# Altium PCB Pukk-Sensor-PCB.PcbDoc (part 6 of 6)
Units mil, origin at the board's own origin, x right, y up, seen from the top; angles counter-clockwise.
Board outline 3937.01 x 3149.61 mil, 4 copper layers (Top Layer, Layer 1, Layer 2, Bottom Layer), stack 61.653 mil thick; 261 components, 166 nets, 704 pads, 236 vias.
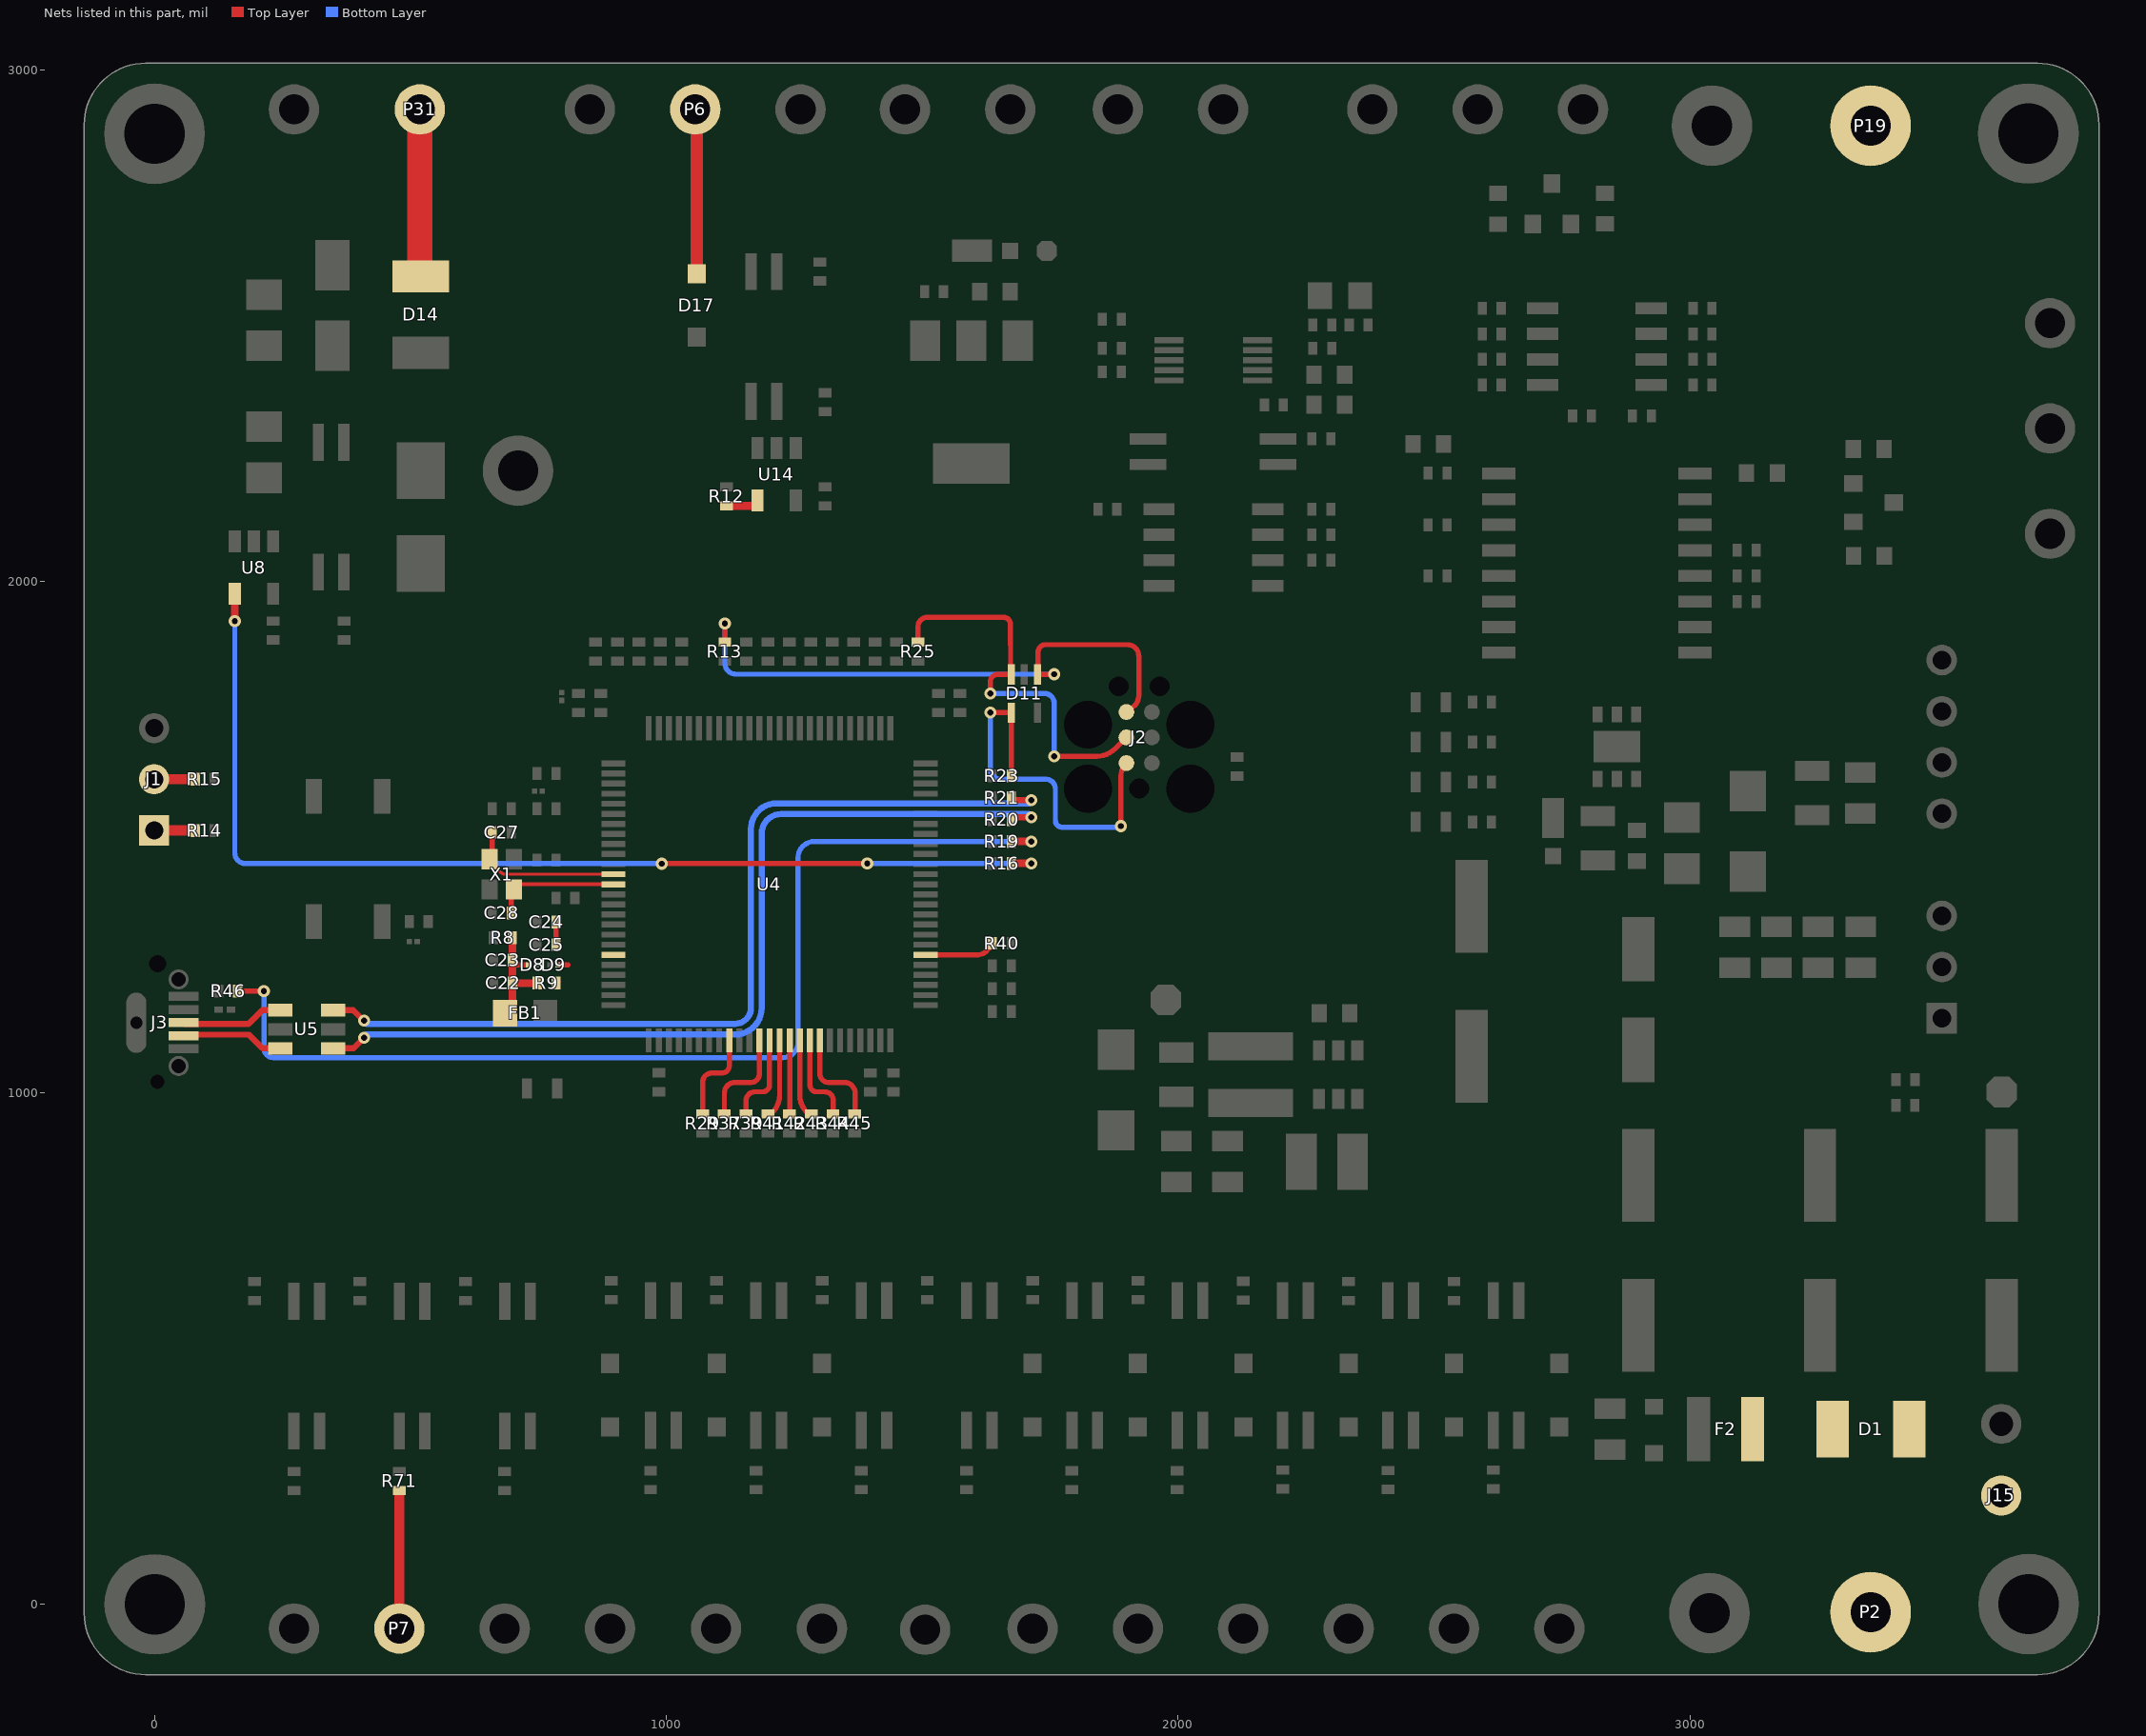
[diagram p5: the nets of this part, all layers, seen from the top]

## Via types
v1: diameter 23.62, hole 11.81, Top Layer to Bottom Layer, tented both sides, 234 vias
v2: diameter 23.62, hole 11.81, Top Layer to Bottom Layer, 2 vias

## Nets (pads, with @x,y where several pads share a name; then routed paths per layer and width w, separated by ;. In a path a pad name is that pad's centre, name@x,y a point inside that pad or via, vN(x,y) a via of type N, cw(c..) or ccw(c..) an arc to the next point about the centre after c; other vN are vias at no path point) (continued)
PD9: R40.1 U4.56 | length 140.2
  Top Layer w10: U4.56@1506.54,1269.57 1608.54,1269.57 ccw(c1608.54,1292.08) 1624.43,1276.15 1632.66,1284.38 1632.66,1284.66 1632.95,1284.66 R40.1@1636.66,1292.16
PE7: R37.2 U4.37 | length 196.2
  Top Layer w10: R37.2@1113.05,958.5 1113.05,999.18 cw(c1134.03,999.18) 1134.03,1020.16 1164.88,1020.16 ccw(c1164.88,1037.01) 1181.74,1037.01 U4.37@1181.74,1102.25
PE8: R39.2 U4.38 | length 176.4
  Top Layer w10: R39.2@1155.51,958.5 1155.51,984.68 cw(c1172.54,984.68) 1172.54,1001.72 1187.64,1001.72 ccw(c1187.64,1015.5) 1201.42,1015.5 U4.38@1201.42,1102.25
PE9: R41.2 U4.39 | length 153.2
  Top Layer w10: R41.2@1198.69,958.5 1206.19,961.61 1207.19,962.02 1208.6,963.43 1208.76,963.59 ccw(c1173.99,995.38) 1221.11,995.38 ; 1221.11,995.43 U4.39@1221.11,1102.25
PE10: R42.2 U4.40 | length 145.7
  Top Layer w10: R42.2@1237.43,958.5 ccw(c1237.43,961.86) 1240.79,961.86 U4.40@1240.79,1102.25
PE11: R43.2 U4.41 | length 153.2
  Top Layer w10: 1260.48,995.38 ccw(c1307.59,995.38) 1272.82,963.59 1272.98,963.43 1274.39,962.02 1275.39,961.61 R43.2@1282.89,958.5 ; 1260.48,995.43 U4.41@1260.48,1102.25
PE12: R44.2 U4.42 | length 176.4
  Top Layer w10: U4.42@1280.16,1102.25 1280.16,1015.5 ccw(c1293.94,1015.5) 1293.94,1001.72 1309.04,1001.72 cw(c1309.04,984.68) 1326.07,984.68 R44.2@1326.07,958.5
PE13: R45.2 U4.43 | length 196.2
  Top Layer w10: U4.43@1299.85,1102.25 1299.85,1037.01 ccw(c1316.7,1037.01) 1316.7,1020.16 1347.55,1020.16 cw(c1347.55,999.18) 1368.53,999.18 R45.2@1368.53,958.5
PH0-OSC_IN: C27.2 U4.12 X1.1 | length 312.3
  Top Layer w6: X1.1@654.57,1456.52 667.32,1439.84 676.56,1430.59 ccw(c685.16,1439.27) 685.16,1427.05 875.68,1427.05 U4.12@896.3,1427.05
  Top Layer w10: X1.1@654.57,1456.52 659.7,1456.52 C27.2@659.7,1508.99
PH1-OSC_OUT: C28.2 U4.13 X1.3 | length 259.2
  Top Layer w7: X1.3@701.82,1407.37 U4.13@896.3,1407.37
  Top Layer w10: C28.2@696.7,1350.99 696.7,1397.47 X1.3@701.82,1397.47 X1.3@701.82,1410.57
RIGHT: P7.1 R71.1 | length 267.5
  Top Layer w20: P7.1@477.9,-47.43 R71.1@477.9,220.03
SNS_SPEED: D17.2 P6.1 | length 323.2
  Top Layer w20: P6.1@1056.11,2922.17 cw(c1056.11,2919.18) P6.1@1059.11,2919.18
  Top Layer w25: D17.2@1059.11,2600.73 P6.1@1059.11,2919.18
SPEED_SIG: R12.2 U14.4 | length 66.5
  Top Layer w15: R12.2@1117.38,2146.98 1167.18,2146.98 ccw(c1167.18,2157.64) U14.4@1177.84,2157.64
SWCLK: D11.3 J2.4 R25.2 | length 792.6
  Top Layer w10: R25.2@1491.64,1880.87 1491.64,1911.34 cw(c1509.6,1911.34) 1509.6,1929.3 1658.4,1929.3 cw(c1658.4,1915.68) 1672.03,1915.68 1672.58,1832.31 D11.3@1673.66,1817.63 1647.08,1817.63 ccw(c1647.08,1803.21) 1632.66,1803.21 v1(1632.66,1780.23) ; v1(1757.8,1657.56) 1840.26,1657.56 ; 1840.3,1657.56 ccw(c1840.3,1709.75) 1877.21,1672.85 J2.4@1898.67,1694.31
  Bottom Layer w10: v1(1632.66,1780.23) 1738.57,1780.23 cw(c1738.57,1761) 1757.8,1761 v1(1757.8,1657.56)
SWDIO: D11.4 J2.2 R23.2 | length 754.1
  Top Layer w10: v1(1632.66,1742.83) D11.4@1673.66,1742.83 R23.2@1673.66,1619.37 R23.2@1673.66,1613.87 ; v1(1888,1521) 1888,1618.55 cw(c1924.43,1618.55) J2.2@1898.67,1644.31
  Bottom Layer w10: v1(1632.66,1742.83) 1632.66,1633.51 ccw(c1653.67,1633.51) 1653.67,1612.51 1741.67,1612.51 cw(c1741.67,1594.24) 1759.94,1594.24 1759.94,1531.75 ccw(c1772.7,1531.75) 1772.7,1519 1886,1519 ccw(c1886,1521) v1(1888,1521)
SWO: D11.1 J2.6 R13.1 | length 1179.7
  Top Layer w10: R13.1@1114.02,1880.87 v1(1114.02,1916.98) ; v1(1757.8,1817.9) 1757.8,1817.63 1731.73,1817.63 cw(c1731.73,1823.28) 1726.09,1823.28 1726.09,1860.52 cw(c1741.36,1860.52) 1741.36,1875.8 1900.7,1875.8 cw(c1900.7,1853.5) 1923,1853.5 1923,1776.65 cw(c1894.56,1776.65) 1911.48,1753.79 J2.6@1898.67,1744.31
  Bottom Layer w10: v1(1114.02,1916.98) 1114.02,1839.93 ccw(c1136.06,1839.93) 1136.06,1817.9 v1(1757.8,1817.9)
TACH_COIL: D14.2 P31.1 | length 327.3
  Top Layer w50: P31.1@517.9,2922.17 517.9,2597.62 D14.2@519.83,2595.69
TACH_SIG: R16.2 U8.4 | length 2114.6
  Top Layer w10: v1(990.68,1447.71) 990.9,1447.93 1392.18,1447.93 v1(1392.4,1448.15)
  Top Layer w15: v1(156.3,1921.92) U8.4@156.3,1975.17 ; R16.2@1673.66,1448.15 v1(1713,1448.15)
  Bottom Layer w10: v1(156.3,1921.92) 156.3,1468.65 ccw(c176.8,1468.65) 176.8,1448.15 990.24,1448.15 v1(990.68,1447.71) ; v1(1392.4,1448.15) v1(1713,1448.15)
TEST_LED: R29.1 U4.34 | length 181.9
  Top Layer w10: R29.1@1070.59,958.5 1070.59,1020.16 cw(c1089.29,1020.16) 1089.29,1038.87 1108.9,1038.87 ccw(c1108.9,1052.65) 1122.68,1052.65 U4.34@1122.68,1102.25
USART1_RX: J1.2 R15.1 | length 76.2
  Top Layer w20: J1.2@-1.3,1612.57 R15.1@74.93,1612.57
USART1_TX: J1.1 R14.1 | length 76.2
  Top Layer w20: J1.1@-1.3,1512.57 R14.1@74.93,1512.57
USB2.0_N: J3.2 U5.6 | length 201
  Top Layer w12: J3.2@56.42,1111.18 58.72,1113.48 142.9,1113.48 ; 142.93,1113.5 183.73,1113.5 210.44,1086.79 245.23,1086.79 U5.6@245.35,1086.67
USB2.0_P: J3.3 U5.4 | length 201.3
  Top Layer w12: J3.3@56.42,1136.77 58.72,1134.48 134.2,1134.48 ; 134.23,1134.5 183.27,1134.5 210.44,1161.67 245.16,1161.67 U5.4@245.43,1161.4
USB_FS_ID: R19.2 R46.1 | length 2108.2
  Top Layer w10: R46.1@161.84,1198.38 v1(213.28,1198.38)
  Top Layer w15: R19.2@1673.66,1490.95 v1(1713,1490.96)
  Bottom Layer w10: v1(213.28,1198.38) 213.28,1087.36 ccw(c232.17,1087.36) 232.17,1068.47 1226.77,1068.47 ccw(c1226.77,1098.6) 1256.91,1098.6 1256.91,1459.12 cw(c1288.75,1459.12) 1288.75,1490.96 v1(1713,1490.96)
USB_FS_N: R20.2 U5.1 | length 1816.4
  Top Layer w12: U5.1@348.65,1086.67 348.77,1086.79 388.41,1086.79 v1(409,1107.38) ; R20.2@1673.66,1533.76 1673.66,1538.35 v1(1713,1538.35)
  Bottom Layer w12: v1(409,1107.38) cw(c415.31,1107.38) 415.31,1113.69 1134.04,1113.69 ccw(c1134.04,1165.65) 1186,1165.65 1186,1506.68 cw(c1223.97,1506.68) 1223.97,1544.66 1706.69,1544.66 cw(c1706.69,1538.35) v1(1713,1538.35)
USB_FS_P: R21.2 U5.3 | length 1820.3
  Top Layer w12: U5.3@348.57,1161.4 348.84,1161.67 387.51,1161.67 408.18,1141 v1(409,1141) ; R21.2@1673.66,1576.56 1673.66,1571.97 v1(1713,1571.97)
  Bottom Layer w12: v1(409,1141) ccw(c415.31,1141) 415.31,1134.69 1134.04,1134.69 ccw(c1134.04,1165.65) 1165,1165.65 1165,1515.38 cw(c1215.28,1515.38) 1215.28,1565.66 1706.69,1565.66 ccw(c1706.69,1571.97) v1(1713,1571.97)
VBAT: D1.2 J15.1 P2.1 P19.1
VDDA: C22.2 C23.2 D8.2 FB1.1 R8.1 R9.2 | length 229.2
  Top Layer w10: FB1.1@684.36,1155.5 FB1.1@699.05,1170.2 ; C23.2@698.7,1259.2 ccw(c708.02,1259.2) C23.2@699.05,1256.67 ; C23.2@699.79,1249.89 D8.2@726.97,1249.89
  Top Layer w15: C23.2@698.7,1259.2 R8.1@698.7,1303.04 ; FB1.1@699.05,1170.2 C22.2@699.05,1214.36 ; C23.2@699.05,1256.67 C22.2@699.05,1214.36 ; R9.2@747.4,1214.37 C22.2@699.05,1214.36
VIN: D1.1 F2.1
VREFP: C24.2 C25.2 D9.2 R9.1 U4.20 | length 65.5
  Top Layer w10: R9.1@783.93,1214.37 R9.1@784.4,1214.37 ccw(c784.4,1217.56) R9.1@787.59,1217.56 ; C25.2@783.93,1289.35 C24.2@783.92,1333.97 ; D9.2@791.8,1249.89 807.16,1249.89
pads on no net: D11.5 J2.MP1 J2.MP2 J2.MP3 J2.MP4 J2.MP5 J2.MP6 J2.MP7 J3. J3.1 U1.5 U1.8 U3.1 U3.4 U3.5 U4.1 U4.2 U4.3 U4.4 U4.5 U4.7 U4.8 U4.9 U4.15 U4.16 U4.17 U4.18 U4.23 U4.24 U4.25 U4.28 U4.29 U4.30 U4.31 U4.32 U4.33 U4.35 U4.36 U4.44 U4.45 U4.46 U4.47 U4.53 U4.54 U4.57 U4.58 U4.59 U4.60 U4.61 U4.62 U4.63 U4.64 U4.65 U4.66 U4.68 U4.77 U4.78 U4.79 U4.85 U4.90 U4.91 U4.97 U4.98 U5.5 U7.4 U7.6 U7.7 U7.14 U8.1 U14.1

## Polygon pours and split planes (outlines as drawn)
GND on Layer 1 "NONET_L-01_P-001" (solid, pour order 3): 2377,2542 cw(c2420,2542) 2420,2585 3215,2585 cw(c3215,2541) 3259,2541 3259,2328 3259,2277.4 cw(c3224.6,2277.4) 3224.6,2243 3122.26,2243 ccw(c3122.26,2198.18) 3077.45,2198.18 3077.45,1970.24 ccw(c3118.82,1971.38) 3119.96,1930 3475.5,1930 3522,1930 cw(c3522.01,1882.01) 3570,1882 3570,1488 3570,1349 cw(c3526.57,1349) 3526.57,1305.57 1860.57,1305.57 ccw(c1860.56,1256) 1811,1256 1811,799 ccw(c1848,799) 1848,762 2732.99,762 cw(c2732.99,701.99) 2793,701.99 2793,381.18 cw(c2744.27,381.17) 2744.26,332.44 -137.79,332.44 -137.79,-20.91 ccw(c-21.27,-20.91) -21.26,-137.43 3682.49,-137.43 ccw(c3682.49,-20.71) 3799.22,-20.71 3799.21,2912.17 ccw(c3699.22,2912.18) 3699.22,3012.17 -36.77,3012.17 ccw(c-36.77,2912.18) -136.77,2912.17 -136.77,2533.32 1554,2533.32 cw(c1554,2498.32) 1589,2498.32 1589,2233.2 ccw(c1631.93,2233.19) 1631.93,2190.27 1968.28,2190.27 ccw(c1968.29,2225.98) 2004,2225.99 2004,2279 cw(c2044.99,2279.01) 2045,2320 2231.18,2320 cw(c2231.18,2282.11) 2269.08,2282.1 2269.08,2015.92 ccw(c2294.74,2015.92) 2294.74,1990.26 2350.18,1990.26 ccw(c2350.83,2016.43) 2377,2015.79
AGND on Layer 1 "NONET_L-01_P-001" (solid, pour order 0): 681,1411.6 ccw(c704.92,1411.6) 704.92,1387.68 945.32,1387.68 cw(c945.32,1361) 972,1361 972,1278.91 cw(c953.59,1278.91) 953.59,1260.5 696.03,1260.5 ccw(c696.03,1245.47) 681,1245.47 681,1197.27 cw(c660.74,1197.26) 660.73,1177 591,1177 cw(c591,1196) 572,1196 572,1572 cw(c603,1572) 603,1603 647.91,1603 cw(c647.91,1569.91) 681,1569.91
GND-ISO on Layer 1 "NONET_L-01_P-001" (solid, pour order 16): -137.79,-17.43 -137.79,2892.17 cw(c-17.79,2892.17) -17.79,3012.17 3679.22,3012.17 cw(c3679.22,2892.17) 3799.22,2892.17 3799.22,-17.43 cw(c3679.22,-17.43) 3679.22,-137.43 -17.79,-137.43 cw(c-17.79,-17.43)
GND on Top Layer "NONET_L-01_P-001" (solid, pour order 26): 2435,1267.11 2435,1124.24 cw(c2412.97,1124.24) 2412.96,1102.21 2371.35,1102.21 2338.37,1102.21 2338.37,1057.96 ccw(c2350.18,1057.96) 2350.18,1046.15 2473.31,1046.15 ccw(c2473.31,1062.84) 2490,1062.84 2490,1172.45 cw(c2507.55,1172.45) 2507.55,1190 2968.45,1190 ccw(c2968.45,1206.25) 2984.7,1206.25 2984.33,1252.17 2984.33,1285 cw(c3003.68,1285) 3003.68,1304.35 3363.7,1304.35 3363.7,1344.35 2867.88,1344.35 2867.88,1328.69 cw(c2844.76,1328.69) 2844.76,1305.57 2650,1305.57 cw(c2650,1330.16) 2625.41,1330.16 2625.41,1437.84 ccw(c2608.28,1437.85) 2608.28,1454.97 2572.33,1454.97 2513.36,1454.97 cw(c2513.36,1474.97) 2493.36,1474.97 2493.36,1626.95 2435,1626.95
3V3-ISO on Top Layer "NONET_L-01_P-001" (solid, pour order 15): 2683,1448.7 cw(c2711.85,1448.7) 2711.85,1477.55 2841.29,1477.55 cw(c2841.29,1464.95) 2853.89,1464.95 2853.89,1354.59 cw(c2844.3,1354.59) 2844.3,1345 2696,1345 cw(c2696,1358) 2683,1358
GND on Top Layer "NONET_L-01_P-001" (solid, pour order 24): 238.35,2744 189.05,2744 ccw(c189.05,2714.95) 160,2714.95 160,2202.1 cw(c130,2202.1) 130,2172.1 -135.38,2172.1 cw(c-135.38,2174.52) -137.79,2174.52 -137.79,2892 cw(c-37.79,2892) -37.79,2992 238.35,2992
12V on Top Layer "NONET_L-01_P-001" (solid, pour order 4): 2507.55,1021 ccw(c2507.55,1034.03) 2520.58,1034.03 2520.58,1138.36 cw(c2543.93,1138.36) 2543.93,1161.71 2757.95,1161.71 2997.71,1161.71 ccw(c2997.71,1180) 3016,1180 3016,1232.5 3016,1255 cw(c3040,1257) 3038,1281 3745,1281 cw(c3745,1250.24) 3775.76,1250.24 3775.76,728.57 cw(c3747.19,728.57) 3747.19,700 3207.62,700 ccw(c3207.62,673.15) 3180.77,673.15 3180.77,474.29 cw(c3151.48,474.29) 3151.48,445 3143,445 3087.4,445 ccw(c3087.4,415.37) 3057.77,415.37 3057.77,274.51 cw(c3035.8,274.51) 3035.79,252.53 2989.99,252.53 cw(c2989.6,274.71) 2967.42,274.33 2967.42,320.91 ccw(c2941.53,320.92) 2941.52,346.81 2813.7,346.81 2813.7,346.28 cw(c2813.7,375.98) 2784,375.98 2784,738 ccw(c2760,738) 2760,762 2317,762 cw(c2317,779.22) 2300.97,772.93 2300.97,1009.19 cw(c2312.78,1009.19) 2312.78,1021
GND on Top Layer "NONET_L-01_P-001" (solid, pour order 5): 3340,670 3235.13,670 ccw(c3235.13,649.99) 3215.12,649.99 3215.12,466.43 ccw(c3237.49,466.43) 3237.49,444.07 3544.55,444.07 cw(c3544.55,419.62) 3569.01,419.62 3569.01,337.64 ccw(c3593.45,337.64) 3593.45,313.2 3756.32,313.2 ccw(c3756.32,332.64) 3775.76,332.64 3775.76,644.12 ccw(c3749.88,644.12) 3749.88,670
GND-ISO on Top Layer "NONET_L-01_P-001" (solid, remove dead copper, pour order 23): -137.79,-17.43 -137.79,2892.17 cw(c-17.79,2892.17) -17.79,3012.17 3679.22,3012.17 cw(c3679.22,2892.17) 3799.22,2892.17 3799.22,-17.43 cw(c3679.22,-17.43) 3679.22,-137.43 -17.79,-137.43 cw(c-17.79,-17.43)
5V on Top Layer "NONET_L-01_P-001" (solid, pour order 13): 1811.92,1060.08 ccw(c1827.46,1060.07) 1827.47,1044.53 2015.47,1044.53 ccw(c2015.47,1058.91) 2029.84,1058.91 2029.84,1211.86 ccw(c2008.7,1211.86) 2008.7,1233 1826.86,1233 ccw(c1826.86,1218.06) 1811.92,1218.06
GND on Top Layer "NONET_L-01_P-001" (solid, pour order 10): 2977.67,1921.9 3112.12,1921.9 ccw(c3112.12,1930) 3120.22,1930 3120.22,1975 cw(c3129.22,1975) 3129.22,1984 3242.22,1984 cw(c3242.22,1972.59) 3253.64,1972.59 3253.64,1863.24 cw(c3238.67,1863.24) 3238.67,1848.28 2976.19,1848.28 cw(c2976.19,1859.47) 2965,1859.47 2965,1909.23 cw(c2977.67,1909.23)
GND on Top Layer "NONET_L-01_P-001" (solid, pour order 9): 1811,969.27 cw(c1823.58,969.27) 1823.58,981.86 1898.07,981.86 cw(c1898.07,965.79) 1914.14,965.79 1914.14,862.05 ccw(c1930.9,862.05) 1930.9,845.29 2158.53,845.29 ccw(c2158.53,867.09) 2180.33,867.09 2180.33,904.94 cw(c2195.68,904.94) 2195.68,920.28 2270.78,920.28 cw(c2270.78,903.87) 2287.19,903.87 2287.19,772.93 cw(c2276.26,772.93) 2276.26,762 1838,762 cw(c1838,789) 1811,789
GND on Top Layer "NONET_L-01_P-001" (solid, pour order 8): 2290.64,2513.18 2290.64,2388.03 ccw(c2298.28,2388.03) 2298.28,2380.39 2338.59,2380.39 ccw(c2338.59,2390.31) 2348.51,2390.32 ccw(c2347.99,2390.35) 2348.51,2390.37 2348.51,2513.18
12V on Layer 2 "NONET_L-01_P-001" (solid, pour order 11): 745,2573.32 ccw(c793.54,2573.32) 793.54,2524.78 2448.78,2524.78 cw(c2448.78,2473.26) 2500.29,2473.26 2500.29,2274.36 ccw(c2516.26,2274.36) 2516.26,2258.39 2969.77,2258.39 cw(c2969.77,2210.09) 3018.07,2210.09 3018.07,363.07 cw(c2955,363.07) 2955,300 967.04,300 ccw(c967.04,232.96) 900,232.96 900,-82.23 ccw(c934.81,-82.23) 934.81,-117.04 3150,-117.04 ccw(c3150,-80.43) 3186.61,-80.43 3186.61,2957.21 ccw(c3186.25,2957.08) 3186.58,2957.26 ccw(c3152.08,2957.28) 3152.1,2991.78 745,2991.78
3V3-ISO on Layer 2 "NONET_L-01_P-001" (solid, pour order 20): 724.61,3012.17 724.61,2573.32 ccw(c793.54,2573.32) 793.54,2504.38 1655.9,2504.38 cw(c1655.9,2455.27) 1705.02,2455.27 1705.02,2350.69 ccw(c1761.1,2350.69) 1761.1,2294.61 2111.76,2294.61 cw(c2111.76,2239.06) 2167.31,2239.06 2167.31,1520.31 cw(c2118.39,1520.31) 2118.39,1471.39 1845.06,1471.39 ccw(c1845.06,1414.94) 1788.61,1414.94 1788.61,997.13 ccw(c1853.53,997.13) 1853.53,932.21 2088.94,932.21 ccw(c2088.94,989.84) 2146.58,989.84 2146.58,1237.74 cw(c2185,1237.74) 2185,1276.16 2592.18,1276.16 ccw(c2592.18,1344.97) 2660.99,1344.97 2660.99,1832.33 cw(c2714.77,1832.33) 2714.77,1886.11 2948.89,1886.11 cw(c2948.89,1835) 3000,1835 3000,378.62 cw(c2941.98,378.62) 2941.98,320.6 946.68,320.6 ccw(c946.68,256.49) 882.58,256.49 882.58,-134.47 cw(c879.61,-134.47) 879.61,-137.43 -17.79,-137.43 cw(c-17.79,-17.43) -137.79,-17.43 -137.79,2892.17 cw(c-17.79,2892.17) -17.79,3012.17
5V on Layer 2 "NONET_L-01_P-001" (solid, pour order 14): 1767.97,2504.78 ccw(c1767.97,2462.22) 1725.41,2462.22 1725.41,2354.59 ccw(c1765,2354.59) 1765,2315 2150.06,2315 cw(c2150.15,2278.14) 2187.01,2278.23 2187.01,1513.01 cw(c2125,1513.01) 2125,1451 1849,1451 ccw(c1849,1411) 1809,1411 1809,1002 ccw(c1858.4,1002) 1858.4,952.6 2073.61,952.6 ccw(c2073.61,1005.18) 2126.18,1005.18 2126.18,1261.37 cw(c2165.81,1261.37) 2165.82,1301 2587.8,1301 ccw(c2587.8,1354.19) 2640.99,1354.19 2640.8,1632.24 2640.8,1871.9 cw(c2675.41,1871.9) 2675.41,1906.51 2977.67,1906.51 ccw(c2977.67,1926.52) 2997.68,1926.52 2997.68,2210.09 ccw(c2969.77,2210.09) 2969.77,2238 2515.76,2238 cw(c2515.76,2273.76) 2480,2273.76 2480,2471.27 ccw(c2446.49,2471.27) 2446.49,2504.78
VBAT on Layer 2 "NONET_L-01_P-001" (solid, pour order 12): 3207,2963.78 cw(c3235,2963.78) 3235,2991.78 3606.11,2991.78 ccw(c3605.36,3011.42) 3625,3012.17 3699.22,3012.17 cw(c3699.22,2912.17) 3799.22,2912.17 3799.22,-37.43 cw(c3699.22,-37.43) 3699.22,-137.43 3634.27,-137.43 ccw(c3613.62,-137.7) 3613.35,-117.04 3239.57,-117.04 cw(c3239.57,-84.47) 3207,-84.47
GND-ISO on Bottom Layer "NONET_L-01_P-001" (solid, remove dead copper, pour order 25): -137.79,-17.43 -137.79,2892.17 cw(c-17.79,2892.17) -17.79,3012.17 3679.22,3012.17 cw(c3679.22,2892.17) 3799.22,2892.17 3799.22,-17.43 cw(c3679.22,-17.43) 3679.22,-137.43 -17.79,-137.43 cw(c-17.79,-17.43)
3V3-ISO on Bottom Layer "NONET_L-01_P-001" (solid, pour order 22): 3116.16,2560 cw(c3116.16,2536.61) 3139.54,2536.61 3139.54,1362.8 cw(c3107.96,1362.8) 3107.96,1331.21 2683,1331.21 cw(c2683,1363.28) 2650.94,1363.28 2650.94,1775.48 cw(c2680.46,1775.48) 2680.46,1805 2744.99,1805 ccw(c2744.99,1840.01) 2780,1840.01 2780,2185 ccw(c2754.57,2185) 2754.56,2210.44 2632.15,2210.44 cw(c2632.15,2239.53) 2603.05,2239.53 2603.05,2546.47 cw(c2621.58,2546.47) 2621.58,2565 2688,2565 cw(c2688,2548.32) 2704.68,2548.32 2704.68,2318.88 ccw(c2732.3,2318.88) 2732.3,2291.26 2966.26,2291.26 ccw(c2966.26,2314.51) 2989.51,2314.51 2989.51,2541.18 cw(c3008.28,2541.23) 3008.24,2560

## Other copper
Top Layer:
  rectangle net GND: 3119.07,1915.23 3230.02,1984
  rectangle net 12V: 2300.97,968.35 2397.74,1021
  rectangle net GND-ISO: 2809.99,1703.6 2829.67,1771.74
  rectangle net GND-ISO: 730.81,1480.2 755.92,1567.77
  rectangle net GND-ISO: 721.35,1559.34 741.99,1591.53
  rectangle net GND-ISO: 761.24,1782.15 827.52,1796.96
  rectangle net GND-ISO: 949.19,1078.63 966.1,1155.5
  rectangle net 12V: 2300.97,924.28 2344.28,1007.72
  rectangle net GND-ISO: 2812.43,1691 2827.1,1739.34
  rectangle net AGND: 737.92,1276.85 755.93,1346.47
  rectangle net NetR79_1: 1571.3,2229.64 1619.88,2469.8
  region net 3V3-ISO: 2776.57,1477.55 2853.89,1477.55 2853.89,1353.64 cw(c2845.25,1353.64) 2845.25,1345 cw(c2845.25,1348.95) 2841.29,1348.95 2841.29,1477.55
  region net GND: 2338.37,1080.09 2338.37,1055.61 ccw(c2347.83,1055.61) 2347.83,1046.15 2351.13,1046.15 ccw(c2351.13,1053.39) 2358.37,1053.39 2358.37,1060.09 ccw(c2338.37,1060.09)
  region net 3V3-ISO: 723.06,1752.23 ccw(c723.06,1734.87) 705.7,1734.87 705.7,1611.92 755.92,1611.92 755.92,1668.4 cw(c764.52,1668.4) 764.52,1677 957.52,1677 958.86,1677 961.48,1677.52 963.96,1678.55 966.18,1680.03 968.07,1681.92 969.56,1684.15 970.58,1686.62 971.11,1689.24 971.1,1690.58 971.11,1736.11 971.11,1737.7 970.49,1740.81 969.27,1743.74 967.51,1746.38 965.26,1748.63 962.62,1750.39 959.69,1751.61 956.58,1752.23
  region net BATT: 854.53,1551.07 919.92,1551.07 919.92,1539.26 773.92,1539.26 cw(c773.92,1545.55) 767.63,1545.55 767.63,1631.79 cw(c773.53,1631.79) 773.53,1637.68 841.6,1637.68 cw(c841.6,1632.23) 847.06,1632.23 847.06,1558.54 ccw(c854.53,1558.54)
  region net 3V3-ISO: 1468,1680.85 cw(c1476.01,1680.85) 1476.01,1688.87 1497.52,1688.87 ccw(c1497.65,1697.76) 1506.54,1697.64 1506.54,1744.7 1507.97,1748.15 1510.61,1750.8 1514.07,1752.23 1545.18,1752.23 1547.99,1751.06 1550.14,1748.91 1551.3,1746.11 1551.3,1647.19 1549.5,1642.83 1546.16,1639.49 1541.8,1637.68 1476.92,1637.68 1472.83,1639.38 1469.7,1642.51 1468,1646.61 1468,1648.82
  region net 5V-ISO: 3272.14,1562.07 3272.14,1514.14 cw(c3256,1514.13) 3256,1498 2958.36,1498 cw(c2958.36,1517.65) 2938.71,1517.65 2938.71,1552.57 ccw(c2937.16,1552.57) 2937.16,1554.12 2937.16,1566.93 ccw(c2928.31,1566.93) 2928.31,1575.78 2896.23,1575.78 cw(c2896.23,1587.22) 2884.79,1587.22 2884.79,1629.1 cw(c2890.68,1629.1) 2890.68,1635 2933,1635 ccw(c2933,1644) 2942,1644 2942,1692 cw(c2956,1692) 2956,1706 3151.64,1706 cw(c3151.64,1689.41) 3168.23,1689.41 3168.23,1579.77 ccw(c3185.93,1579.77) 3185.93,1562.07
  region net NetC9_2: 1954,1021 2287.19,1021 2287.19,954.37 cw(c2273.82,954.37) 2273.82,941 2176,941 ccw(c2176,922) 2157,922 2157,889.18 cw(c2141.82,889.18) 2141.82,874 1956,874 cw(c1956,888) 1942,888 1942,1009 cw(c1954,1009)
  region net VBAT: 3540.01,354.83 3540.01,315.49 ccw(c3573.08,315.49) 3573.08,282.42 3744.54,282.42 cw(c3744.53,251.95) 3775,251.94 3775,176 3775,174.1 3774.5,170.33 3773.52,166.66 3772.06,163.15 3770.16,159.85 3767.85,156.84 3765.16,154.15 3762.15,151.84 3758.85,149.93 3755.34,148.48 3751.67,147.5 3747.9,147 3746,147 3522.38,147 3520.46,146.94 3516.65,146.44 3512.94,145.44 3509.39,143.97 3506.06,142.05 3503.01,139.71 3500.29,136.99 3497.95,133.94 3496.03,130.61 3494.56,127.06 3493.56,123.35 3493.06,119.54 3493,117.62 3493,-86 3493,-87.9 3492.5,-91.67 3491.52,-95.34 3490.07,-98.85 3488.16,-102.15 3485.85,-105.16 3483.16,-107.85 3480.15,-110.16 3476.85,-112.07 3473.34,-113.52 3469.67,-114.5 3465.9,-115 3464,-115 3260.97,-115 3256.94,-114.47 3253.01,-113.42 3249.26,-111.86 3245.74,-109.83 3242.52,-107.36 3239.64,-104.48 3237.17,-101.26 3235.14,-97.74 3233.58,-93.99 3233,-91.81 3233,197 3233.59,202.76 3234.38,205.7 3235.73,208.97 3237.5,212.03 3239.66,214.84 3242.16,217.34 3244.97,219.5 3248.03,221.27 3251.3,222.62 3254.72,223.54 3258.23,224 3260,224 3342,224 3343.39,224.05 3346.15,224.41 3348.84,225.13 3351.41,226.19 3353.82,227.58 3356.03,229.28 3357.99,231.25 3359.69,233.45 3361.08,235.86 3362.14,238.43 3362.86,241.12 3363.23,243.88 3363.27,245.27 3363.27,324.74 3363.27,384.31 cw(c3391.02,384.31) 3391.02,412.06 3512.9,412.06 cw(c3512.89,384.94) 3540.01,384.93
  region net VIN: 3088.82,390.93 cw(c3111.46,390.93) 3111.46,413.57 3291.95,413.57 cw(c3291.77,385.18) 3320.16,385 3320.16,271.16 cw(c3301.1,271.16) 3301.1,252.1 3111.46,252.1 cw(c3111.46,274.74) 3088.82,274.74
  region net VREFP: 806.56,1352.39 780.84,1352.39 ccw(c780.84,1343.79) 772.24,1343.78 772.24,1278.66 ccw(c780.41,1278.66) 780.41,1270.5 792.27,1270.5 cw(c792.27,1265.29) 797.48,1265.29 797.48,1237.74 cw(c791.45,1237.74) 791.45,1231.71 774.22,1231.71 ccw(c774.22,1226.73) 769.24,1226.73 769.24,1202.56 ccw(c775.06,1202.56) 775.06,1196.74 810.45,1196.74 ccw(c810.46,1204.72) 818.44,1204.72 818.44,1258.7 cw(c823.27,1258.7) 823.27,1263.54 919.92,1263.54 919.92,1275.48 851.97,1275.48 cw(c851.97,1280.42) 847.03,1280.42 847.03,1343.42 ccw(c838.07,1343.42) 838.06,1352.39
  region net NetC12_2: 2847.39,1629.1 2847.39,1592.39 cw(c2839,1592.39) 2839,1584 2793.54,1584 ccw(c2793.54,1577.42) 2786.96,1577.42 2786.96,1507.41 ccw(c2796.72,1507.41) 2796.73,1497.65 2913.73,1497.65 ccw(c2913.73,1507.31) 2923.38,1507.31 2923.38,1550.98 ccw(c2913.73,1550.98) 2913.73,1560.64 2876.48,1560.64 cw(c2876.48,1570.05) 2867.07,1570.05 2867.07,1629.1
  region net NetFB1_2: 739.48,1181.49 820.8,1181.49 ccw(c820.8,1191.18) 830.5,1191.18 830.5,1248.23 cw(c838.06,1248.23) 838.06,1255.79 919.92,1255.79 919.92,1243.98 863.38,1243.98 ccw(c863.38,1236.11) 855.5,1236.11 855.5,1131.95 cw(c848.89,1131.95) 848.89,1125.33 737.81,1125.33 cw(c737.81,1132.31) 730.83,1132.31 730.83,1172.84 cw(c739.48,1172.84)
  region net NetC1_2: 3218.14,1706 ccw(c3218.14,1682) 3194.14,1682 3194.14,1607.36 ccw(c3215.75,1607.61) 3216,1586 3282.71,1586 3282.71,1586.19 3382.71,1586.19 3382.71,1586 3462.31,1586 3472.97,1592.16 3485.69,1595.57 3498.86,1595.57 3511.57,1592.16 3522.24,1586 3543.98,1586 3551.33,1589.04 3556.96,1594.67 3560,1602.02 3560,1689.98 3556.96,1697.33 3551.33,1702.96 3543.98,1706 3523.42,1706 3522.97,1705.56 3511.57,1698.97 3498.86,1695.57 3485.69,1695.57 3472.97,1698.97 3461.57,1705.56 3461.13,1706
  pour cut-out: 1673.66,1761.73 1510.73,1761.73 1510.73,1917.54 1673.66,1917.54
  pour cut-out: -117.4,1870 -117.4,2157.14 366.69,2157.14 366.69,2319.36 445,2319.36 445,3012.17 925,3012.17 925,1870
  pour cut-out: 1790.61,1147.45 1794.62,1147.45 1794.62,970.51 1790.61,970.51
  pour cut-out: 2673.87,1480.11 2671.04,1477.28 2652.45,1495.87 2655.28,1498.7
  pour cut-out: 2640.96,1562.28 2635.15,1562.28 2635.15,1658.04 2640.96,1658.04
  pour cut-out: 1983.06,1728.82 1933.18,1728.82 1933.18,1774.5 1983.06,1774.5
  pour cut-out: 1717.92,1842.37 1680.59,1842.37 1680.59,1881.42 1717.92,1881.42
  pour cut-out: 2056.67,1973 1924.55,1973 1924.55,2065.35 2056.67,2065.35
  pour cut-out: 1048.8,1862.37 1011.47,1862.37 1011.47,1934.51 1048.8,1934.51
  region net GND: 416.09,2991.47 420.59,2990.32 424.9,2988.59 428.95,2986.32 432.67,2983.53 435.99,2980.29 438.86,2976.63 441.23,2972.64 443.06,2968.37 444.31,2963.89 444.97,2959.29 445,2956.97 445,2345 445,2343.52 444.42,2340.62 443.29,2337.89 441.65,2335.44 439.56,2333.35 437.11,2331.71 434.38,2330.58 431.48,2330 430,2330 399.86,2330 349.08,2330 348.03,2329.95 345.99,2329.54 344.06,2328.74 342.32,2327.58 340.85,2326.11 339.69,2324.37 338.89,2322.45 338.48,2320.4 338.43,2319.36 338.43,2243.11 338.43,2242.35 338.14,2240.87 337.56,2239.47 336.72,2238.22 335.65,2237.15 334.39,2236.31 333,2235.73 331.51,2235.43 330.76,2235.43 293.72,2235.43 292.07,2235.76 290.51,2236.41 289.11,2237.35 287.91,2238.54 286.97,2239.94 286.33,2241.5 286,2243.16 286,2367 286,2368.38 286.54,2371.08 287.59,2373.63 289.12,2375.92 291.08,2377.87 293.37,2379.41 295.92,2380.46 298.62,2381 300,2381 390,2381 391.01,2381.05 392.99,2381.44 394.85,2382.22 396.53,2383.34 397.96,2384.76 399.08,2386.44 399.86,2388.31 400.25,2390.29 400.3,2391.3 400.3,2548.4 400.2,2550.35 399.44,2554.16 397.96,2557.76 395.79,2560.99 393.04,2563.74 389.81,2565.91 386.21,2567.39 382.4,2568.15 380.45,2568.25 315.11,2568.25 313.69,2568.25 310.86,2568.62 308.11,2569.36 305.48,2570.45 303.01,2571.87 300.75,2573.61 298.74,2575.62 297,2577.88 295.58,2580.35 294.49,2582.98 293.75,2585.73 293.38,2588.56 293.38,2589.98 293.38,2722.62 293.34,2724.02 292.97,2726.79 292.25,2729.49 291.18,2732.08 289.78,2734.5 288.08,2736.72 286.1,2738.69 283.88,2740.4 281.46,2741.8 278.87,2742.87 276.17,2743.59 273.4,2743.95 272,2744 204.7,2744 203,2744 199.62,2744.44 196.33,2745.33 193.18,2746.63 190.23,2748.34 187.52,2750.41 185.11,2752.82 183.04,2755.52 181.33,2758.48 180.03,2761.62 179.15,2764.92 178.7,2768.3 178.7,2770 178.7,2965.7 178.7,2967.43 179.15,2970.84 180.05,2974.17 181.36,2977.36 183.09,2980.34 185.19,2983.08 187.62,2985.52 190.36,2987.62 193.34,2989.34 196.53,2990.66 199.86,2991.55 203.28,2992 205,2992 409.15,2992 411.48,2992.03
  region net NetC7_1: 2348.78,1233 2354.26,1231.98 2357.4,1230.68 2361.68,1226.4 2364,1220.81 2364,1217.78 2364,1130.82 2364,1129.43 2362.93,1126.84 2360.95,1124.87 2358.37,1123.8 2331.69,1123.79 2330.3,1123.66 2327.74,1122.6 2325.79,1120.64 2324.73,1118.08 2324.59,1116.7 2324.59,1062.84 2305.7,1062.84 2300.83,1063.66 2300.01,1068.52 2300.01,1179.99 2299.8,1182.16 2298.14,1186.17 2295.07,1189.23 2291.06,1190.9 2288.89,1191.11 2236.11,1191.11 2233.84,1190.89 2229.66,1189.15 2226.46,1185.95 2224.72,1181.77 2224.5,1179.5 2224.5,1059.52 2221.96,1053.39 2217.26,1048.69 2211.13,1046.15 2073.19,1046.15 2066.74,1048.82 2061.81,1053.75 2059.15,1060.19 2059.15,1136.49 2059.15,1214.69 2062.63,1223.09 2069.05,1229.52 2077.45,1233
Layer 2:
  region net VBAT: 3385.07,426 3522.29,426 3527.79,425.18 3530.68,423.98 3533.58,422.05 3536.05,419.58 3537.99,416.68 3539.33,413.45 3540.01,410.03 3540.01,408.29 3540.01,324.73 3540.07,322.66 3540.61,318.58 3541.68,314.59 3543.26,310.78 3545.32,307.21 3547.83,303.94 3550.75,301.02 3554.02,298.51 3557.59,296.45 3561.4,294.87 3565.39,293.8 3569.48,293.26 3571.54,293.2 3749.26,293.2 3752.84,292.73 3756.32,291.79 3759.66,290.41 3762.79,288.6 3765.65,286.4 3768.21,283.85 3770.41,280.99 3772.21,277.86 3773.59,274.52 3774.53,271.03 3775,267.45 3775,176 3775,174.1 3774.5,170.33 3773.52,166.66 3772.06,163.15 3770.16,159.85 3767.85,156.84 3765.16,154.15 3762.15,151.84 3758.85,149.93 3755.34,148.48 3751.67,147.5 3747.9,147 3746,147 3522.38,147 3520.46,146.94 3516.65,146.44 3512.94,145.44 3509.39,143.97 3506.06,142.05 3503.01,139.71 3500.29,136.99 3497.95,133.94 3496.03,130.61 3494.56,127.06 3493.56,123.35 3493.06,119.54 3493,117.62 3493,-86 3493,-87.9 3492.5,-91.67 3491.52,-95.34 3490.07,-98.85 3488.16,-102.15 3485.85,-105.16 3483.16,-107.85 3480.15,-110.16 3476.85,-112.07 3473.34,-113.52 3469.67,-114.5 3465.9,-115 3464,-115 3260.97,-115 3256.94,-114.47 3253.01,-113.42 3249.26,-111.86 3245.74,-109.83 3242.52,-107.36 3239.64,-104.48 3237.17,-101.26 3235.14,-97.74 3233.58,-93.99 3233,-91.81 3233,197 3233.59,202.76 3234.38,205.7 3235.73,208.97 3237.5,212.03 3239.66,214.84 3242.16,217.34 3244.97,219.5 3248.03,221.27 3251.3,222.62 3254.72,223.54 3258.23,224 3260,224 3342,224 3343.39,224.05 3346.15,224.41 3348.84,225.13 3351.41,226.19 3353.82,227.58 3356.03,229.28 3357.99,231.25 3359.69,233.45 3361.08,235.86 3362.14,238.43 3362.86,241.12 3363.23,243.88 3363.27,245.27 3363.27,404.2 3364.03,409.89 3364.38,411.22 3365.48,413.86 3366.91,416.34 3368.65,418.6 3370.67,420.63 3372.93,422.37 3375.41,423.79 3378.05,424.89 3380.81,425.63 3383.64,426
Bottom Layer:
  pour cut-out: 856.95,1459.57 819.61,1459.57 819.61,1500.72 856.95,1500.72
  pour cut-out: 766.19,1459.57 728.85,1459.57 728.85,1500.72 766.19,1500.72
  pour cut-out: 740.67,1534.69 703.34,1534.69 703.34,1575.84 740.67,1575.84
  pour cut-out: 2483.03,1794.37 2445.7,1794.37 2445.7,1835.51 2483.03,1835.51
  pour cut-out: 2619.94,646.43 2619.94,637.86 2200.71,637.86 2200.71,646.43
  pour cut-out: 2786.65,2462.69 2749.31,2462.69 2749.31,2503.83 2786.65,2503.83
  pour cut-out: 2577.24,2413.83 2543.58,2413.83 2543.58,2503.83 2577.24,2503.83
Multi-Layer:
  pour cut-out: -140.72,0 ccw(c0,0) 0,-140.72 ccw(c0,0) 140.72,0 ccw(c0,0) 0,140.73 ccw(c0,0)
  pour cut-out: -141.08,2874.38 ccw(c-0.36,2874.38) -0.36,2733.66 ccw(c-0.36,2874.38) 140.37,2874.38 ccw(c-0.36,2874.38) -0.36,3015.11 ccw(c-0.36,2874.38)
  pour cut-out: 3520.7,2874.74 ccw(c3661.42,2874.74) 3661.42,2734.01 ccw(c3661.42,2874.74) 3802.15,2874.74 ccw(c3661.42,2874.74) 3661.42,3015.46 ccw(c3661.42,2874.74)
  pour cut-out: 3521.06,0.36 ccw(c3661.78,0.36) 3661.78,-140.37 ccw(c3661.78,0.36) 3802.51,0.36 ccw(c3661.78,0.36) 3661.78,141.08 ccw(c3661.78,0.36)

## Silkscreen, mask and mechanical layers (free items; w line width, h text height)
Top Overlay:
  drawing of 150 lines, arcs and shapes, not listed
  text "COIL" at 596.7,2855.25 h50 r180
  text "GND" at 1340.78,2855.25 h50 r180
  text "FUEL" at 1750.71,2855.25 h50 r180
  text "NTC 1" at 2166.64,2855.25 h50 r180
  text "CAN-P" at 2663.99,2855.25 h50 r180
  text "GND" at 350.81,2852.85 h50 r180
  text "12V" at 929.02,2852.85 h50 r180
  text "SPEED" at 1134.89,2852.85 h50 r180
  text "GND" at 1544.82,2852.85 h50 r180
  text "NTC 2" at 1960.75,2852.85 h50 r180
  text "IS-GND" at 2458.1,2852.85 h50 r180
  text "CAN-N" at 2869.85,2852.85 h50 r180
  text "GND" at 3161.46,2788.51 h50 r180
  text "V-BAT" at 3471.46,2787.93 h50 r180
  text "TACHOMETER" at 598.85,2784.74 h70 r180
  text "SPEED SENSOR" at 1340.78,2784.74 h70 r180
  text "FUEL LEVEL" at 1750.71,2784.44 h70 r180
  text "COOLANT" at 2166.64,2784.74 h70 r180
  text "PUKK DIPSLAY MODULE" at 3198.33,2641.53 h70 r180
  text "FUEL" at 1784.83,2618.66 h70
  text "GND" at 3634.38,2425.52 h50 r90
  text "CAN-P" at 3636.78,2219.63 h50 r90
  text "COIL" at 802.43,2189.86 h70
  text "BIKE CAN BUS" at 3491.46,2096.83 h70 r90
  text "CAN-N" at 3634.38,2013.76 h50 r90
  text "TAG CON" at 1771.67,1836.68 h70
  text "3V3" at 2271.11,1734.69 h70
  text "5VS" at 2271.11,1656.66 h70
  text "BOOT" at 279.28,1655.23 h70
  text "5V0" at 2271.11,1578.64 h70
  text "12V" at 2271.11,1500.9 h70
  text "UART" at -68.54,1462.57 h70 r90
  text "RESET" at 279.28,1410.23 h70
  text "*" at 561.77,1175.34 h100
  text "5V0" at 2029.14,1152.96 h70
  text "USB" at -67.96,991.1 h70 r90
  text "TEST" at 506.27,980.23 h70
  text "12V" at 3662.32,973.23 h60
  text "*" at -102.71,861.37 h100
  text "GND" at 3672.22,324.23 h60
  text "INPUT" at 3111.58,193.5 h70
  text "BAT" at 3679.77,184.23 h60
  text "ALERT SIGNALS" at 568.17,136.37 h70
  text "GEAR SIGNALS" at 2021.74,136.37 h70
  text "V-BAT" at 3234.93,86.81 h50
  text "GND" at 2919.93,84.23 h50
  text "GEAR-1" at 2675.96,29.91 h50
  text "H-BEAM" at 191.92,25.91 h50
  text "O-TEMP" at 1017.76,24.49 h50
  text "E-TEMP" at 1224.93,22.29 h50
  text "GEAR-4" at 2048.14,22.29 h50
  text "O-PRES" at 810.88,21.99 h50
  text "GEAR-5" at 1842.51,21.89 h50
  text "GEAR-3" at 2254.25,21.89 h50
  text "GEAR-2" at 2460.16,21.89 h50
  text "RIGHT" at 399.1,19.49 h50
  text "LEFT" at 604.96,19.91 h50
  text "NETRL" at 1636.68,19.91 h50
  text "GND" at 1426.61,17.27 h50
Bottom Overlay:
  text "Rev-v1.0" at -45.69,1950.21 h60 r270
  text "PUKK-SENSOR-MODULE" at 57.41,1642.31 h60 r270
Board Outline:
  the board outline again, w10
Fabrication:
  drawing of 295 lines, arcs and shapes, not listed
  text "Layer" at 4587.14,3230.85 h60
  text "Name" at 4997.05,3230.85 h60
  text "Material" at 5926.8,3230.85 h60
  text "Thickness" at 6786.57,3230.85 h60
  text "Constant" at 7436.4,3230.85 h60
  text "Board Layer Stack" at 8006.26,3230.85 h60
  text "Top Overlay" at 4997.05,3110.85 h60
  text "Top Solder" at 4997.05,2990.85 h60
  text "Solder Resist" at 5926.8,2990.85 h60
  text "0.010mm" at 6786.57,2990.85 h60
  text "3.5" at 7436.4,2990.85 h60
  text "1" at 4587.14,2870.85 h60
  text "Top Layer" at 4997.05,2870.85 h60
  text "0.035mm" at 6786.57,2870.85 h60
  text "Dielectric 2" at 4997.05,2750.85 h60
  text "PP-006" at 5926.8,2750.85 h60
  text "0.203mm" at 6786.57,2750.85 h60
  text "4.4" at 7436.4,2750.85 h60
  text "2" at 4587.14,2630.85 h60
  text "Layer 1" at 4997.05,2630.85 h60
  text "CF-004" at 5926.8,2630.85 h60
  text "0.030mm" at 6786.57,2630.85 h60
  text "Dielectric 1" at 4997.05,2510.85 h60
  text "FR-4" at 5926.8,2510.85 h60
  text "1.030mm" at 6786.57,2510.85 h60
  text "4.4" at 7436.4,2510.85 h60
  text "3" at 4587.14,2390.85 h60
  text "Layer 2" at 4997.05,2390.85 h60
  text "CF-004" at 5926.8,2390.85 h60
  text "0.030mm" at 6786.57,2390.85 h60
  text "Dielectric 3" at 4997.05,2270.85 h60
  text "PP-006" at 5926.8,2270.85 h60
  text "0.203mm" at 6786.57,2270.85 h60
  text "4.4" at 7436.4,2270.85 h60
  text "4" at 4587.14,2150.85 h60
  text "Bottom Layer" at 4997.05,2150.85 h60
  text "0.035mm" at 6786.57,2150.85 h60
  text "Bottom Solder" at 4997.05,2030.85 h60
  text "Solder Resist" at 5926.8,2030.85 h60
  text "0.010mm" at 6786.57,2030.85 h60
  text "3.5" at 7436.4,2030.85 h60
  text "Bottom Overlay" at 4997.05,1910.85 h60
  text "Total board thickness:" at 4587.14,1790.85 h60
  text "1.586mm" at 6786.57,1790.85 h60
Drill Drawing:
  drawing of 152 lines, arcs and shapes, not listed
  text "Symbol" at -112.5,6128.94 h72
  text "Count" at 393.38,6128.94 h72
  text "Hole Size" at 993.22,6128.94 h72
  text "Plated" at 2112.89,6128.94 h72
  text "Hole Type" at 2618.77,6128.94 h72
  text "Drill Layer Pair" at 3352.57,6128.94 h72
  text "Via/Pad" at 4852.12,6128.94 h72
  text "Pad Shape" at 5441.97,6128.94 h72
  text "Template" at 6187.77,6128.94 h72
  text "233" at 393.38,5978.94 h60
  text "0.300mm (11.81mil)" at 993.22,5978.94 h60
  text "PTH" at 2112.89,5978.94 h60
  text "Round" at 2618.77,5978.94 h60
  text "Top Layer - Bottom Layer" at 3352.57,5978.94 h60
  text "Via" at 4852.12,5978.94 h60
  text "Rounded" at 5441.97,5978.94 h60
  text "(Mixed)" at 6187.77,5978.94 h60
  text "1" at 393.38,5828.94 h60
  text "0.600mm (23.62mil)" at 993.22,5828.94 h60
  text "PTH" at 2112.89,5828.94 h60
  text "Slot" at 2618.77,5828.94 h60
  text "Top Layer - Bottom Layer" at 3352.57,5828.94 h60
  text "Pad" at 4852.12,5828.94 h60
  text "Rounded" at 5441.97,5828.94 h60
  text "r100_300h60_260r50m110_310mx110_310p0" at 6187.77,5828.94 h60
  text "1" at 393.38,5678.94 h60
  text "0.700mm (27.56mil)" at 993.22,5678.94 h60
  text "NPTH" at 2112.89,5678.94 h60
  text "Round" at 2618.77,5678.94 h60
  text "Top Layer - Bottom Layer" at 3352.57,5678.94 h60
  text "Pad" at 4852.12,5678.94 h60
  text "Rounded" at 5441.97,5678.94 h60
  text "c0hn70p0" at 6187.77,5678.94 h60
  text "2" at 393.38,5528.94 h60
  text "0.700mm (27.56mil)" at 993.22,5528.94 h60
  text "PTH" at 2112.89,5528.94 h60
  text "Round" at 2618.77,5528.94 h60
  text "Top Layer - Bottom Layer" at 3352.57,5528.94 h60
  text "Pad" at 4852.12,5528.94 h60
  text "Rounded" at 5441.97,5528.94 h60
  text "c100h70m110mx110p0" at 6187.77,5528.94 h60
  text "1" at 393.38,5378.94 h60
  text "0.850mm (33.46mil)" at 993.22,5378.94 h60
  text "NPTH" at 2112.89,5378.94 h60
  text "Round" at 2618.77,5378.94 h60
  text "Top Layer - Bottom Layer" at 3352.57,5378.94 h60
  text "Pad" at 4852.12,5378.94 h60
  text "Rounded" at 5441.97,5378.94 h60
  text "c0hn85p0" at 6187.77,5378.94 h60
  text "3" at 393.38,5228.94 h60
  text "0.900mm (35.43mil)" at 993.22,5228.94 h60
  text "PTH" at 2112.89,5228.94 h60
  text "Round" at 2618.77,5228.94 h60
  text "Top Layer - Bottom Layer" at 3352.57,5228.94 h60
  text "Pad" at 4852.12,5228.94 h60
  text "(Mixed)" at 5441.97,5228.94 h60
  text "(Mixed)" at 6187.77,5228.94 h60
  text "7" at 393.38,5078.94 h60
  text "0.914mm (36.00mil)" at 993.22,5078.94 h60
  text "PTH" at 2112.89,5078.94 h60
  text "Round" at 2618.77,5078.94 h60
  text "Top Layer - Bottom Layer" at 3352.57,5078.94 h60
  text "Pad" at 4852.12,5078.94 h60
  text "(Mixed)" at 5441.97,5078.94 h60
  text "(Mixed)" at 6187.77,5078.94 h60
  text "3" at 393.38,4928.94 h60
  text "0.991mm (39.02mil)" at 993.22,4928.94 h60
  text "NPTH" at 2112.89,4928.94 h60
  text "Round" at 2618.77,4928.94 h60
  text "Top Layer - Bottom Layer" at 3352.57,4928.94 h60
  text "Pad" at 4852.12,4928.94 h60
  text "Rounded" at 5441.97,4928.94 h60
  text "c0hn99" at 6187.77,4928.94 h60
  text "2" at 393.38,4778.94 h60
  text "1.200mm (47.24mil)" at 993.22,4778.94 h60
  text "PTH" at 2112.89,4778.94 h60
  text "Round" at 2618.77,4778.94 h60
  text "Top Layer - Bottom Layer" at 3352.57,4778.94 h60
  text "Pad" at 4852.12,4778.94 h60
  text "Rounded" at 5441.97,4778.94 h60
  text "c200h120" at 6187.77,4778.94 h60
  text "28" at 393.38,4628.94 h60
  text "1.500mm (59.06mil)" at 993.22,4628.94 h60
  text "PTH" at 2112.89,4628.94 h60
  text "Round" at 2618.77,4628.94 h60
  text "Top Layer - Bottom Layer" at 3352.57,4628.94 h60
  text "Pad" at 4852.12,4628.94 h60
  text "Rounded" at 5441.97,4628.94 h60
  text "c250h150" at 6187.77,4628.94 h60
  text "5" at 393.38,4478.94 h60
  text "2.000mm (78.74mil)" at 993.22,4478.94 h60
  text "PTH" at 2112.89,4478.94 h60
  text "Round" at 2618.77,4478.94 h60
  text "Top Layer - Bottom Layer" at 3352.57,4478.94 h60
  text "Pad" at 4852.12,4478.94 h60
  text "Rounded" at 5441.97,4478.94 h60
  text "(Mixed)" at 6187.77,4478.94 h60
  text "4" at 393.38,4328.94 h60
  text "2.375mm (93.50mil)" at 993.22,4328.94 h60
  text "NPTH" at 2112.89,4328.94 h60
  text "Round" at 2618.77,4328.94 h60
  text "Top Layer - Bottom Layer" at 3352.57,4328.94 h60
  text "Pad" at 4852.12,4328.94 h60
  text "Rounded" at 5441.97,4328.94 h60
  text "c0hn238" at 6187.77,4328.94 h60
  text "4" at 393.38,4178.94 h60
  text "3.000mm (118.11mil)" at 993.22,4178.94 h60
  text "PTH" at 2112.89,4178.94 h60
  text "Round" at 2618.77,4178.94 h60
  text "Top Layer - Bottom Layer" at 3352.57,4178.94 h60
  text "Pad" at 4852.12,4178.94 h60
  text "Rounded" at 5441.97,4178.94 h60
  text "c500h300" at 6187.77,4178.94 h60
  text "294 Total" at 393.38,4028.94 h60
  text "Slot definitions :" at -112.5,3883.97 h60
  text "Routed Path Length" at 920.19,3883.97 h60
  text "= Calculated from tool start centre position to tool end centre position." at 2022.86,3883.97 h60
  text "Hole Length" at 920.19,3783.99 h60
  text "= Routed Path Length + Tool Size = Slot length as defined in the PCB layout" at 1612.99,3783.99 h60

## Dimensions
3679.22,3012.17 to 3679.22,-137.43 on Dimension
-137.79,2892.17 to 3799.22,2892.17 on Dimension

## Text inside footprints (layer, text, board x,y; h text height)
U1: Top Overlay "1" at 3572.27,1132.57 h60 r90